# Altium PCB iMX6 Rex_V1I1_PCB.PcbDoc (part 3 of 8)
Units mm, origin at the board's own origin, x right, y up, seen from the top; angles counter-clockwise.
Board outline 70 x 40 mm, 12 copper layers (L1, L2, L3, L4, L5 (PWR), L6 (PWR), L7 (PWR), L8 (PWR), L9, L10, L11, L12), stack 1.566 mm thick; 473 components, 409 nets, 2294 pads, 1880 vias.
Unrouted connection lines stored in the file: 7.
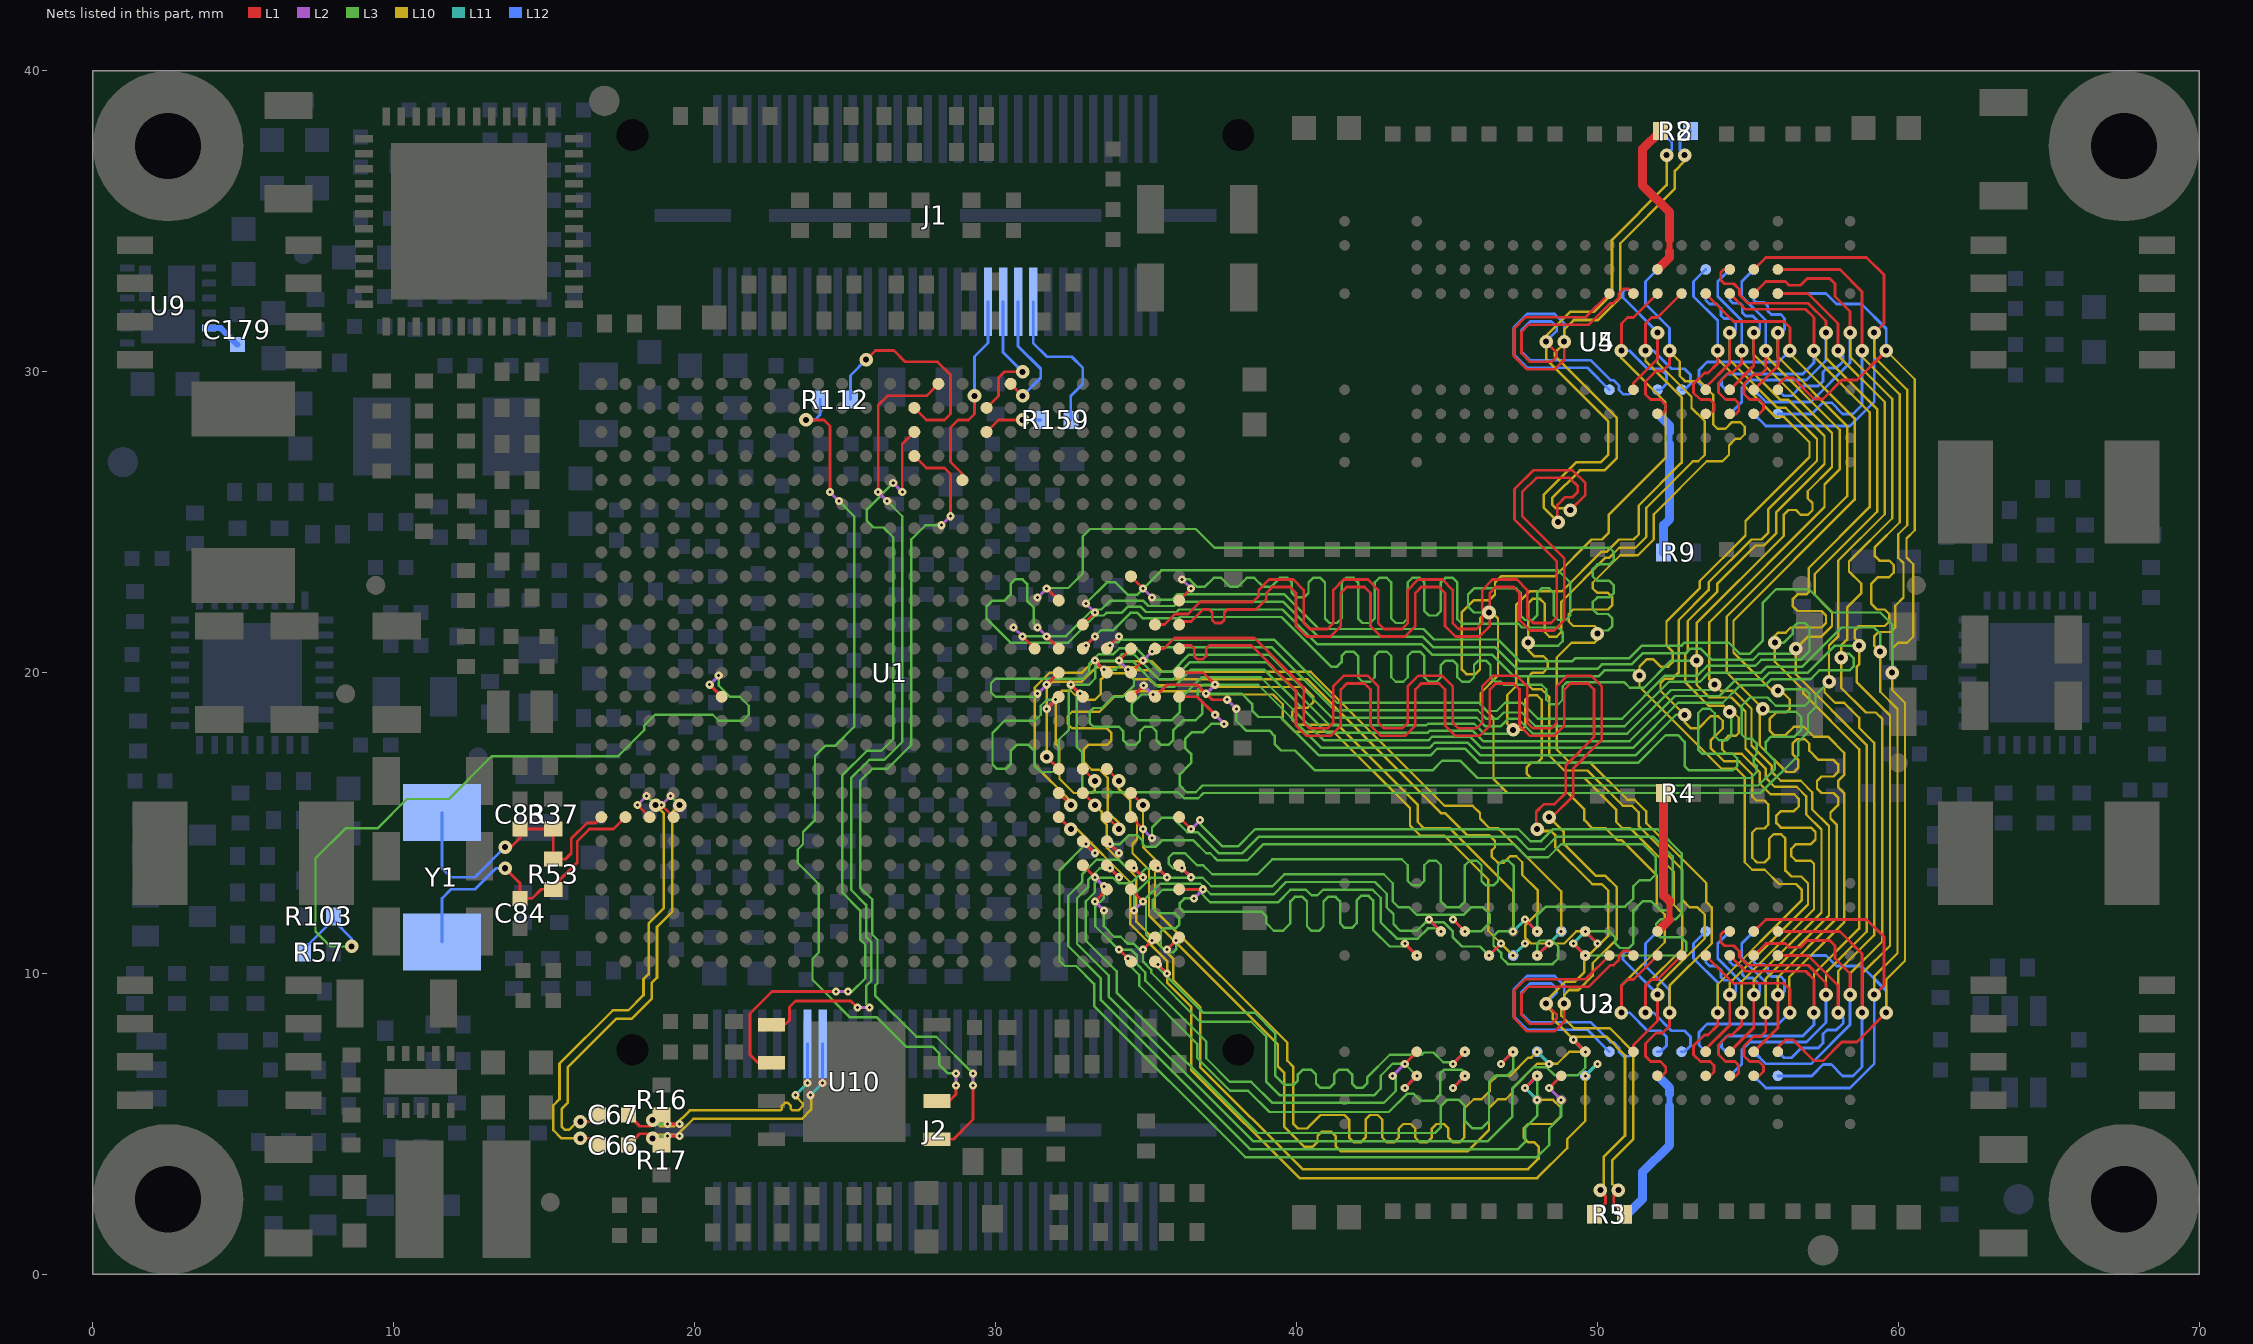
[diagram p13: the nets of this part, all layers, seen from the top]

## Via types
v1: diameter 0.45, hole 0.2, L1 to L12, tented both sides, 761 vias
v2: diameter 0.27, hole 0.1, L1 to L2, 305 vias
v3: diameter 0.27, hole 0.1, L2 to L3, 290 vias
v4: diameter 0.45, hole 0.2, L3 to L10, 196 vias
v5: diameter 0.27, hole 0.1, L11 to L12, 185 vias
v6: diameter 0.27, hole 0.1, L10 to L11, 142 vias
v7: diameter 0.45, hole 0.2, L3 to L10, tented both sides, 1 vias

## Nets (pads, with @x,y where several pads share a name; then routed paths per layer and width w, separated by ;. In a path a pad name is that pad's centre, name@x,y a point inside that pad or via, vN(x,y) a via of type N, cw(c..) or ccw(c..) an arc to the next point about the centre after c; other vN are vias at no path point) (continued)
BOOT_MODE1: R57.2 R103.1 U1.F12 | length 26.1
  L1 w0.093: v2(20.5,19.6) U1.F12@20.9,19.2
  L2 w0.1: v2(20.5,19.6) v3(20.8,19.9)
  L3 w0.08: v1(8.6,10.9) 7.9,10.9 7.4,11.4 7.4,13.83 8.395,14.825 9.455,14.825 10.43,15.8 11.831,15.8 13.256,17.225 17.461,17.225 18.325,18.089 18.325,18.238 18.687,18.6 20.6,18.6 20.8,18.4 21.6,18.4 21.8,18.6 21.8,18.9 21.5,19.2 21.17,19.2 20.8,19.57 v3(20.8,19.9)
  L12 w0.093: R57.2@7,10.7 7,10.8 R103.1@8,11.8 ; R103.1@8,11.9 R103.1@8,11.8 ; v1(8.6,10.9) 8.6,11.17 8,11.77 R103.1@8,11.8
CFF: C179.2 U9.11 | length 1.2
  L12 w0.2: U9.11@3.86,31.45 4.25,31.45 C179.2@4.8,30.9
CLK1_C_N: C66.1 U1.C7 | length 15.9
  L1 w0.09: v1(16.2,4.525) 16.575,4.525 C66.1@16.8,4.3 ; v2(18.1,15.6) U1.C7@18.5,15.2
  L2 w0.1: v2(18.1,15.6) v3(18.4,15.9)
  L3 w0.085: v3(18.4,15.9) v4(18.7,15.6)
  L10 w0.085: v1(16.2,4.525) 15.575,4.525 15.3,4.8 15.3,5.616 15.508,5.824 15.508,7.004 17.284,8.78 17.8,8.78 18.3,9.28 18.3,9.816 18.468,9.983 18.468,11.664 18.97,12.167 18.97,15.33 v4(18.7,15.6)
CLK1_C_P: C67.1 U1.D7 | length 15.8
  L1 w0.09: v1(16.2,5.075) 16.575,5.075 C67.1@16.8,5.3 ; v2(18.9,15.6) U1.D7@19.3,15.2
  L2 w0.1: v2(18.9,15.6) v3(19.2,15.9)
  L3 w0.085: v3(19.2,15.9) v4(19.5,15.6)
  L10 w0.085: v1(16.2,5.075) 16.096,5.075 15.826,4.805 15.691,4.805 15.58,4.916 15.58,5.5 15.788,5.708 15.788,6.888 17.4,8.5 17.916,8.5 18.58,9.164 18.58,9.7 18.748,9.867 18.748,11.548 19.25,12.051 19.25,15.35 ; 19.25,15.35 v4(19.5,15.6) 19.25,15.35
CLK1_N: C66.2 J2.46 R17.2 | length 11.1
  L1 w0.09: C66.2@17.8,4.3 18.175,4.675 18.525,4.675 R17.2@18.9,4.3 19.2,4.6 v2(19.5,4.6)
  L2 w0.1: v3(19.1,4.6) v2(19.5,4.6)
  L3 w0.085: v4(18.6,4.525) 18.675,4.6 v3(19.1,4.6)
  L10 w0.085: v4(18.6,4.525) 18.725,4.65 19.431,4.65 19.953,5.173 23.568,5.173 23.87,5.474 23.87,5.937 v6(23.85,5.957)
  L11 w0.1: v6(23.85,5.957) v5(24.25,6.358)
  L12 w0.09: v5(24.25,6.358) J2.46@24.25,7.67
CLK1_P: C67.2 J2.48 R16.2 | length 11.1
  L1 w0.09: C67.2@17.8,5.3 18.175,4.925 18.525,4.925 R16.2@18.9,5.3 19.2,5 v2(19.5,5)
  L2 w0.1: v3(19.1,5) v2(19.5,5)
  L3 w0.085: v4(18.6,5.125) 18.725,5 v3(19.1,5)
  L10 w0.085: v4(18.6,5.125) 18.654,5.125 18.849,4.93 19.315,4.93 19.838,5.453 22.853,5.453 22.9,5.5 22.9,5.6 23,5.7 23.1,5.7 23.2,5.6 23.2,5.5 23.247,5.453 23.453,5.453 23.59,5.59 23.59,5.69 23.35,5.931 v6(23.35,5.957)
  L11 w0.1: v6(23.35,5.957) v5(23.75,6.358)
  L12 w0.09: v5(23.75,6.358) J2.48@23.75,7.67
CPU_XTALI: C83.1 R37.1 R53.1 U1.A7 Y1.1 | length 10
  L1 w0.093: v1(13.7,14.2) 13.9,14.2 14.2,14.5 C83.1@14.2,14.8 R37.1@15.3,14.8 R53.1@15.3,13.8 15.7,13.8 15.9,14 15.9,14.483 16.417,15 16.7,15 U1.A7@16.9,15.2
  L12 w0.093: Y1.1@11.6,15.35 11.6,13.5 11.9,13.2 12.7,13.2 v1(13.7,14.2)
CPU_XTALO: C84.1 R53.2 U1.B7 Y1.2 | length 10.2
  L1 w0.093: v1(13.7,13.5) 14.2,13 14.2,12.6 C84.1@14.3,12.6 ; C84.1@14.2,12.5 14.6,12.5 14.9,12.8 R53.2@15.3,12.8 ; R53.2@15.3,12.9 16.1,13.7 16.1,14.4 16.5,14.8 17.3,14.8 U1.B7@17.7,15.2
  L12 w0.093: Y1.2@11.6,11.05 11.6,12.5 11.9,12.8 12.7,12.8 13.4,13.5 v1(13.7,13.5)
CSPI2_CLK: J1.17 R159.2 | length 5.3
  L12 w0.093: J1.17@31.25,32.33 31.25,30.955 31.705,30.5 32.53,30.5 32.9,30.13 32.9,29.6 32.5,29.2 R159.2@32.5,28.4
CSPI2_CLK_R: R159.1 U1.U23 | length 2
  L1 w0.093: U1.U23@29.7,28 30.1,28.4 v1(30.9,28.4)
  L12 w0.093: v1(30.9,28.4) R159.1@31.5,28.4
CSPI2_CS0: J1.19 U1.V25 | length 4.3
  L1 w0.093: U1.V25@30.5,29.6 v1(30.9,29.2)
  L12 w0.093: J1.19@30.75,32.33 30.75,30.85 31.5,30.1 31.5,29.8 v1(30.9,29.2)
CSPI2_MISO: J1.21 U1.U24 | length 4.6
  L1 w0.093: U1.U24@29.7,28.8 30.1,29.2 30.1,29.8 30.3,30 v1(30.9,30)
  L12 w0.093: J1.21@30.25,32.33 30.25,30.65 v1(30.9,30)
CSPI2_MOSI: J1.23 U1.T21 | length 6.8
  L1 w0.093: U1.T21@28.9,26.4 28.9,26.6 28.5,27 28.5,28.15 28.75,28.4 29.1,28.4 29.3,28.6 v1(29.3,29.2)
  L12 w0.093: v1(29.3,29.2) 29.3,30.505 29.75,30.955 J1.23@29.75,32.33
CSPI3_CLK: R112.2 U10.6 | length 29.7
  L1 w0.093: v1(23.7,28.4) 24.3,28.4 24.5,28.2 v2(24.5,26) ; U10.6@28.05,5.765 28.465,5.765 28.688,5.988 v2(28.688,6.28)
  L2 w0.1: v2(24.5,26) v3(24.8,25.7) ; v2(28.688,6.28) v3(28.688,6.68)
  L3 w0.08: v3(24.8,25.7) 25.3,25.2 25.3,18.2 24.675,17.575 24.345,17.575 24,17.23 24,15.1 23.6,14.7 23.6,14.297 23.425,14.122 23.425,13.678 24.125,12.978 24.125,10.7 23.915,10.49 23.915,9.795 25.168,8.543 26.057,8.543 27.027,7.573 27.905,7.573 28.125,7.353 28.125,6.975 28.42,6.68 v3(28.688,6.68)
  L12 w0.093: v1(23.7,28.4) 24,28.4 24.175,28.575 R112.2@24.175,29.075
CSPI3_CLK_R: R112.1 U1.P24 | length 7.6
  L1 w0.093: v1(25.7,30.4) 26.005,30.705 26.625,30.705 27,30.33 28.07,30.33 28.5,29.9 28.5,28.6 28.3,28.4 27.7,28.4 U1.P24@27.3,28.8
  L12 w0.093: R112.1@25.175,29.075 25.175,29.875 v1(25.7,30.4)
CSPI3_CS2: U1.R25 U10.1 | length 28
  L1 w0.093: U10.1@22.55,8.305 23.005,8.305 23.15,8.45 23.15,8.893 23.35,9.093 25.188,9.093 v2(25.413,8.868) ; v2(26.1,26) 26.1,28.895 26.405,29.2 27.7,29.2 U1.R25@28.1,29.6
  L2 w0.1: v2(25.413,8.868) v3(25.812,8.868) ; v2(26.1,26) v3(26.4,25.7)
  L3 w0.08: v3(25.812,8.868) 25.7,8.98 25.7,9.587 25.875,9.762 25.875,11.038 25.7,11.213 25.7,12.283 25.2,12.783 25.2,16.5 25.8,17.1 26.3,17.1 26.9,17.7 26.9,25.2 v3(26.4,25.7)
CSPI3_MISO: U1.P23 U10.2 | length 27.8
  L1 w0.093: U10.2@22.55,7.035 22.107,7.035 21.84,7.302 21.84,8.667 22.573,9.4 v2(24.7,9.4) ; v2(26.9,26) 26.9,27.6 U1.P23@27.3,28
  L2 w0.1: v2(24.7,9.4) v3(25.1,9.4) ; v3(26.6,26.3) v2(26.9,26)
  L3 w0.08: v3(25.1,9.4) 25.23,9.4 25.675,9.845 25.675,10.955 25.5,11.13 25.5,12.1 24.9,12.7 24.9,16.583 25.717,17.4 26.201,17.4 26.6,17.799 26.6,24.5 26.275,24.825 25.945,24.825 25.725,25.045 25.725,25.428 26.597,26.3 v3(26.6,26.3)
CSPI3_MOSI: U1.P22 U10.5 | length 28.2
  L1 w0.093: U1.P22@27.3,27.2 27.7,26.8 28.3,26.8 28.5,26.6 v2(28.5,25.2) ; U10.5@28.05,4.495 28.6,4.495 29.25,5.145 v2(29.25,6.28)
  L2 w0.1: v3(28.2,24.9) v2(28.5,25.2) ; v2(29.25,6.28) v3(29.25,6.68)
  L3 w0.08: v3(28.2,24.9) 27.67,24.9 27.2,24.43 27.2,17.6 26.4,16.8 25.9,16.8 25.5,16.4 25.5,12.866 25.9,12.466 25.9,11.3 26.075,11.125 26.075,9.679 25.998,9.602 25.998,9.272 27.37,7.9 28.03,7.9 v3(29.25,6.68)
DRAM0_ZQ: R4.2 U2.L8 | length 4.8
  L1 w0.2: 52.4,11.8 52.4,12.401
  L1 w0.3: U2.L8@52,11.4 52.4,11.8 ; R4.2@52.2,16 52.2,12.601 52.4,12.401
DRAM1_ZQ: R5.2 U3.L8 | length 5.4
  L12 w0.2: 52.4,5.599 52.4,6.001
  L12 w0.3: R5.2@50.9,2 51,2 51.5,2.5 51.5,3.4 52.4,4.3 52.4,5.599 ; U3.L8@52,6.6 52.4,6.2 52.4,6.001
DRAM2_ZQ: R8.2 U4.L8 | length 5.4
  L1 w0.2: 52.4,33.999 52.4,34.401
  L1 w0.3: U4.L8@52,33.4 52.4,33.8 52.4,33.999 ; R8.2@52.1,38 51.5,37.4 51.5,36.2 52.4,35.3 52.4,34.401
DRAM3_ZQ: R9.2 U5.L8 | length 4.8
  L12 w0.2: 52.4,27.599 52.4,28.001
  L12 w0.3: U5.L8@52,28.6 52.4,28.2 52.4,28.001 ; R9.2@52.2,24 52.2,24.9 52.4,25.1 52.4,27.599
DRAM_A0: U1.AC14 U2.N3 U3.N3 U4.N3 U5.N3 | length 70.8
  L1 w0.093: v2(34.1,20.4) U1.AC14@34.5,20.8 ; U2.N3@53.6,7.4 53.6,7.483 54.4,8.283 v1(54.4,9.3) ; U4.N3@53.6,29.4 53.6,29.483 54.4,30.283 v1(54.4,31.3)
  L2 w0.1: v2(34.1,20.4) v3(34.4,20.1)
  L3 w0.08: v3(34.4,20.1) 34.6,19.9 34.6,19.57 34.23,19.2 33.903,19.2 33.528,18.825 33.25,18.825 33.125,18.7 33.125,18.325 33.25,18.2 34.1,18.2 34.25,18.05 34.25,17.75 34.4,17.6 34.65,17.6 34.8,17.75 34.8,18.05 34.95,18.2 35.2,18.2 35.35,18.05 35.35,17.75 35.5,17.6 35.75,17.6 35.9,17.75 35.9,18.083 36.242,18.425 36.655,18.425 36.875,18.645 36.875,19.022 36.715,19.182 36.715,19.418 36.897,19.6 38.73,19.6 40.83,17.5 44.421,17.5 44.596,17.675 45.687,17.675 46.112,17.25 51.267,17.25 52.617,18.6 v4(52.9,18.6)
  L10 w0.08: v1(54.4,9.3) 54.4,9.691 57,12.291 57,13 56.775,13.225 56.448,13.225 56.25,13.423 56.25,14.488 56.109,14.629 55.859,14.629 55.709,14.479 55.709,13.841 55.559,13.691 55.309,13.691 55.15,13.85 55.15,14.689 55.28,14.82 55.55,14.82 55.675,14.945 55.675,15.625 55.55,15.75 55.28,15.75 55.15,15.88 55.15,16.616 54.716,17.05 54.216,17.05 53.766,17.5 53.766,17.75 54.166,18.15 54.166,18.4 54.016,18.55 53.766,18.55 53.366,18.15 53.116,18.15 52.9,18.366 v4(52.9,18.6) 52.1,19.4 52.1,19.65 52.25,19.8 52.5,19.8 52.7,20 52.7,21.742 53.7,22.742 53.7,23.004 55.121,24.425 55.455,24.425 55.675,24.645 55.675,25.418 57.3,27.043 57.3,27.762 56.262,28.8 55.993,28.8 54.4,30.393 v1(54.4,31.3)
  L12 w0.093: U3.N3@53.6,10.6 53.6,10.383 53.729,10.254 53.963,10.254 54.109,10.109 54.109,9.874 54.208,9.775 54.442,9.775 54.6,9.617 54.6,9.4 54.5,9.3 v1(54.4,9.3) ; U5.N3@53.6,32.6 53.6,32.383 53.729,32.254 53.963,32.254 54.109,32.109 54.109,31.874 54.208,31.775 54.442,31.775 54.6,31.617 54.6,31.4 54.5,31.3 v1(54.4,31.3)
DRAM_A1: U1.AB14 U2.P7 U3.P7 U4.P7 U5.P7 | length 74
  L1 w0.093: U1.AB14@33.7,20.8 v2(34.1,21.2) ; U2.P7@54.4,10.6 54.925,10.075 56.925,10.075 57.2,9.8 v1(57.2,8.7) ; U4.P7@54.4,32.6 54.925,32.075 56.925,32.075 57.2,31.8 v1(57.2,30.7)
  L2 w0.1: v3(33.8,20.9) v2(34.1,21.2)
  L3 w0.08: v3(33.8,20.9) 33.907,21.007 34.076,21.007 34.169,21.1 39.252,21.1 41.352,19 46.059,19 46.334,18.725 46.655,18.725 46.93,19 47.496,19 48.021,18.475 50.828,18.475 52.253,19.9 53.33,19.9 53.655,20.225 55.246,20.225 55.446,20.425 56.755,20.425 57.05,20.72 57.05,21.5 56.9,21.65 56.65,21.65 56.5,21.5 56.5,21.3 56.2,21 v4(55.9,21)
  L10 w0.08: v1(57.2,8.7) 57.2,9.993 58.7,11.493 58.7,17.454 56.85,19.304 56.85,19.413 55.9,20.363 v4(55.9,21) 55.9,21.225 56,21.325 56.255,21.325 56.43,21.5 57.45,21.5 57.6,21.65 57.6,21.9 57.45,22.05 56.65,22.05 56.5,22.2 56.5,22.45 56.65,22.6 56.95,22.6 57.025,22.675 57.025,23.475 59.05,25.5 59.05,28.657 57.2,30.507 v1(57.2,30.7)
  L12 w0.093: U3.P7@54.4,7.4 54.275,7.4 54.125,7.55 54.125,7.742 54.308,7.925 56.825,7.925 57.2,8.3 v1(57.2,8.7) ; U5.P7@54.4,29.4 54.275,29.4 54.125,29.55 54.125,29.742 54.308,29.925 56.825,29.925 57.2,30.3 v1(57.2,30.7)
DRAM_A2: U1.AA14 U2.P3 U3.P3 U4.P3 U5.P3 | length 68.5
  L1 w0.093: U1.AA14@32.9,20.8 v2(33.3,21.2) ; U2.P3@54.4,7.4 55.2,8.2 v1(55.2,9.3) ; U4.P3@54.4,29.4 55.2,30.2 v1(55.2,31.3)
  L2 w0.1: v3(33,20.9) v2(33.3,21.2)
  L3 w0.08: v3(33,20.9) 33.515,21.415 33.918,21.415 34.315,21.812 34.315,21.818 34.482,21.985 34.718,21.985 34.888,21.815 36.094,21.815 36.129,21.85 39.501,21.85 41.151,20.2 41.351,20.2 41.5,20.349 41.5,20.549 41.651,20.699 41.901,20.699 42.051,20.549 42.051,19.85 42.201,19.7 42.451,19.7 42.601,19.85 42.601,20.549 ; 42.6,20.55 42.749,20.699 43.001,20.699 43.151,20.549 43.151,19.85 43.301,19.7 43.551,19.7 43.701,19.85 43.701,20.551 43.849,20.699 44.101,20.699 44.251,20.549 44.251,19.85 44.401,19.7 44.651,19.7 44.801,19.85 44.801,20.249 44.949,20.399 45.201,20.399 45.351,20.249 45.351,19.85 45.501,19.7 45.751,19.7 45.901,19.85 45.901,20.25 46.051,20.4 46.301,20.4 46.451,20.25 46.451,19.851 46.601,19.701 46.782,19.701 46.883,19.6 48.15,19.6 48.3,19.45 48.3,19.099 48.449,18.95 48.7,18.95 48.85,19.1 48.85,19.55 48.975,19.675 50.9,19.675 51.075,19.5 51.55,19.5 52.45,20.4 v4(53.3,20.4)
  L10 w0.08: v1(55.2,9.3) 55.2,9.784 57.45,12.034 57.45,14.783 56.943,15.289 56.943,15.889 56.626,16.207 55.893,16.207 55.6,16.5 55.6,16.8 54.925,17.475 54.925,18.705 54.455,19.175 53.725,19.175 53.3,19.6 v4(53.3,20.4) 53.3,21.65 56.2,24.55 56.2,25.256 56.35,25.406 56.6,25.406 56.756,25.25 57,25.25 57.15,25.4 57.15,25.638 56.994,25.794 56.994,26.029 57.8,26.835 57.8,27.97 55.2,30.57 v1(55.2,31.3)
  L12 w0.093: U3.P3@54.4,10.6 54.4,10.383 54.504,10.279 54.738,10.279 54.816,10.201 54.816,9.967 54.929,9.854 55.163,9.854 55.4,9.617 55.4,9.4 55.3,9.3 v1(55.2,9.3) ; U5.P3@54.4,32.6 54.4,32.383 54.504,32.279 54.738,32.279 54.816,32.201 54.816,31.967 54.929,31.854 55.163,31.854 55.4,31.617 55.4,31.4 55.3,31.3 v1(55.2,31.3)
DRAM_A3: U1.Y14 U2.N2 U3.N2 U4.N2 U5.N2 | length 72.4
  L1 w0.093: v2(31.7,21.2) U1.Y14@32.1,20.8 ; U2.N2@53.6,6.6 53.75,6.6 53.875,6.725 53.875,6.95 53.75,7.075 53.425,7.075 53.2,7.3 53.2,7.6 53.563,7.963 53.68,7.963 54,8.283 v1(54,8.7) ; U4.N2@53.6,28.6 53.75,28.6 53.875,28.725 53.875,28.95 53.75,29.075 53.425,29.075 53.2,29.3 53.2,29.6 53.563,29.963 53.68,29.963 54,30.283 v1(54,30.7)
  L2 w0.1: v3(31.4,21.5) v2(31.7,21.2)
  L3 w0.08: v3(31.4,21.5) 31.275,21.625 31.275,22.155 31.051,22.38 31.051,22.949 30.901,23.099 30.651,23.099 30.501,22.949 30.501,22.601 30.286,22.386 29.886,22.386 29.7,22.2 29.7,21.8 30.5,21 32.414,21 33.314,21.9 33.597,21.9 33.682,21.985 34.185,21.985 34.385,22.185 34.829,22.185 34.999,22.015 36.011,22.015 36.096,22.1 39.534,22.1 40.684,20.95 44.154,20.95 44.504,20.6 46.5,20.6 47.225,19.875 50.033,19.875 50.233,20.075 51.225,20.075 v4(51.4,19.9)
  L10 w0.08: v1(54,8.7) 54,9.645 56.8,12.445 56.8,12.78 56.605,12.975 56.038,12.975 55.563,13.45 55.15,13.45 54.9,13.7 54.9,16.533 54.633,16.8 54.133,16.8 51.4,19.533 v4(51.4,19.9) 51.4,20.2 51.65,20.45 51.85,20.45 52.1,20.2 52.35,20.2 52.5,20.35 52.5,20.7 52.3,20.9 52.3,21.7 53.4,22.8 53.4,23.037 54.925,24.562 54.925,25.038 57.05,27.163 57.05,27.659 56.209,28.5 55.926,28.5 54,30.426 v1(54,30.7)
  L12 w0.093: U3.N2@53.6,11.4 53.2,11 53.2,10.5 54,9.7 v1(54,8.7) ; U5.N2@53.6,33.4 53.2,33 53.2,32.5 54,31.7 v1(54,30.7)
DRAM_A4: U1.W14 U2.P8 U3.P8 U4.P8 U5.P8 | length 75.9
  L1 w0.093: v2(30.9,21.2) U1.W14@31.3,20.8 ; U2.P8@54.4,11.4 54.2,11.4 54.1,11.3 54.1,11.05 54.225,10.925 54.535,10.925 54.725,10.735 54.725,10.558 55.008,10.275 57.008,10.275 57.6,9.683 v1(57.6,9.3) ; U4.P8@54.4,33.4 54.2,33.4 54.1,33.3 54.1,33.05 54.225,32.925 54.535,32.925 54.725,32.735 54.725,32.558 55.008,32.275 57.008,32.275 57.6,31.683 v1(57.6,31.3)
  L2 w0.1: v3(30.6,21.5) v2(30.9,21.2)
  L3 w0.08: v3(30.6,21.5) 30.885,21.215 32.346,21.215 33.231,22.1 33.514,22.1 33.799,22.385 34.912,22.385 35.082,22.215 35.928,22.215 36.063,22.35 39.566,22.35 40.716,21.2 44.187,21.2 44.537,20.85 46.6,20.85 47.325,20.125 50,20.125 50.15,20.275 51.141,20.275 51.516,20.65 52.95,20.65 53.1,20.8 53.43,20.8 53.805,20.425 55.163,20.425 55.363,20.625 56.425,20.625 v4(56.6,20.8)
  L10 w0.08: v1(57.6,9.3) 57.6,10.039 58.95,11.389 58.95,17.596 56.6,19.946 v4(56.6,20.8) 57,21.2 57.45,21.2 57.8,21.55 57.8,22.02 57.225,22.595 57.225,23.275 59.3,25.35 59.3,27.5 59.3,28.761 57.6,30.461 v1(57.6,31.3)
  L12 w0.093: U3.P8@54.4,6.6 54.8,7 54.8,7.46 55.065,7.725 56.95,7.725 57.6,8.375 v1(57.6,9.3) ; U5.P8@54.4,28.6 54.8,29 54.8,29.46 55.065,29.725 56.95,29.725 57.6,30.375 v1(57.6,31.3)
DRAM_A5: U1.AE13 U2.P2 U3.P2 U4.P2 U5.P2 | length 73.2
  L1 w0.093: U1.AE13@36.1,20 36.9,20 v2(37.3,19.6) ; U2.P2@54.4,6.6 54.6,6.6 54.7,6.7 54.7,6.95 54.575,7.075 54.265,7.075 54.025,7.315 54.025,7.625 54.363,7.963 54.48,7.963 54.8,8.283 v1(54.8,8.7) ; U4.P2@54.4,28.6 54.6,28.6 54.7,28.7 54.7,28.95 54.575,29.075 54.265,29.075 54.025,29.315 54.025,29.625 54.363,29.963 54.48,29.963 54.8,30.283 v1(54.8,30.7)
  L2 w0.1: v3(37,19.3) v2(37.3,19.6)
  L3 w0.08: v3(37,19.3) 37.003,19.303 38.183,19.303 38.525,18.961 38.525,18.745 38.745,18.525 39.473,18.525 40.748,17.25 44.454,17.25 44.679,17.475 45.604,17.475 46.079,17 51.35,17 52.275,17.925 52.675,17.925 52.9,17.7 52.9,16.9 53.05,16.75 54.5,16.75 54.65,16.9 54.65,17.15 54.5,17.3 53.5,17.3 53.35,17.45 53.35,18.65 53.5,18.8 53.75,18.8 53.9,18.65 53.9,17.9 54.05,17.75 54.3,17.75 54.45,17.9 54.45,18.65 v4(54.4,18.7)
  L10 w0.08: v1(54.8,8.7) 54.8,9.738 57.2,12.138 57.2,13.65 57.1,13.75 56.6,13.75 56.45,13.9 56.45,14.15 56.6,14.3 57.1,14.3 57.25,14.45 57.25,14.7 57.1,14.85 56.1,14.85 55.95,15 55.95,15.25 56.1,15.4 56.537,15.4 56.693,15.557 56.693,15.807 56.543,15.957 55.757,15.957 55.4,16.313 55.4,16.7 54.8,17.3 54.3,17.3 54.15,17.45 54.15,17.7 54.35,17.9 54.6,17.9 54.7,18 54.7,18.5 54.5,18.7 v4(54.4,18.7) 54.2,18.9 53.7,18.9 52.925,19.675 52.925,20.63 53,20.705 53,21.709 53.991,22.7 53.991,22.962 55.254,24.225 55.538,24.225 55.95,24.637 55.95,25.339 57.55,26.939 57.55,27.866 56.341,29.075 56.071,29.075 54.8,30.346 v1(54.8,30.7)
  L12 w0.093: U3.P2@54.4,11.4 54,11 54,10.5 54.8,9.7 v1(54.8,8.7) ; U5.P2@54.4,33.4 54,33 54,32.5 54.8,31.7 v1(54.8,30.7)
DRAM_A6: U1.AC13 U2.R8 U3.R8 U4.R8 U5.R8 | length 79.7
  L1 w0.093: U1.AC13@34.5,20 v2(34.9,20.4) ; U2.R8@55.2,11.4 55.6,11.8 58.95,11.8 59.525,11.225 59.525,9.6 59.225,9.3 v1(59.2,9.3) ; U4.R8@55.2,33.4 55.6,33.8 58.95,33.8 59.525,33.225 59.525,31.6 59.225,31.3 v1(59.2,31.3)
  L2 w0.1: v2(34.9,20.4) v3(35.2,20.7)
  L3 w0.08: v3(35.2,20.7) 35.35,20.85 39.169,20.85 41.269,18.75 46.026,18.75 46.301,18.475 46.688,18.475 46.888,18.675 47.488,18.675 47.938,18.225 50.911,18.225 52.386,19.7 53.413,19.7 53.713,20 55.434,20 55.634,20.2 56.813,20.2 58.113,21.5 59.2,21.5 59.4,21.3 v4(59.4,20.7)
  L10 w0.08: v1(59.2,9.3) 59.2,9.9 59.975,10.675 59.975,18.791 59.4,19.366 v4(59.4,20.7) 59.2,20.9 59.2,21.2 59.35,21.35 59.75,21.35 59.9,21.5 59.9,22.225 60.175,22.5 60.175,23.645 60,23.82 60,24.6 60.3,24.9 60.3,29.399 59.2,30.499 v1(59.2,31.3)
  L12 w0.093: U3.R8@55.2,6.6 55.6,6.2 58.4,6.2 59.2,7 v1(59.2,9.3) ; U5.R8@55.2,28.6 55.6,28.2 58.4,28.2 59.2,29 v1(59.2,31.3)
DRAM_A7: U1.Y13 U2.R2 U3.R2 U4.R2 U5.R2 | length 71
  L1 w0.093: v2(31.7,19.6) U1.Y13@32.1,20 ; U2.R2@55.2,6.6 55.375,6.6 55.525,6.75 55.525,6.925 55.375,7.075 55.065,7.075 54.875,7.265 54.875,7.592 55.191,7.909 55.426,7.909 55.6,8.083 v1(55.6,8.7) ; U4.R2@55.2,28.6 55.375,28.6 55.525,28.75 55.525,28.925 55.375,29.075 55.065,29.075 54.875,29.265 54.875,29.592 55.191,29.909 55.426,29.909 55.6,30.083 v1(55.6,30.7)
  L2 w0.1: v3(31.4,19.3) v2(31.7,19.6)
  L3 w0.08: v3(31.4,19.3) 31.3,19.2 30,19.2 29.85,19.35 29.85,19.65 30,19.8 32.9,19.8 33.115,20.015 33.115,20.301 33.429,20.615 33.918,20.615 34.11,20.807 34.69,20.807 35.472,20.025 35.859,20.025 36.434,20.6 39.087,20.6 41.187,18.5 45.993,18.5 46.268,18.225 46.795,18.225 47.045,18.475 47.355,18.475 47.855,17.975 50.994,17.975 52.444,19.425 53.725,19.425 v4(53.9,19.6)
  L10 w0.08: v1(55.6,8.7) 55.6,9.83 57.7,11.93 57.7,14.9 57.143,15.457 57.143,16.022 56.759,16.407 56.093,16.407 55.8,16.7 55.8,16.9 55.125,17.575 55.125,18.8 54.525,19.4 54.1,19.4 v4(53.9,19.6) 53.725,19.775 53.725,21.675 57.55,25.5 57.55,26.253 58.05,26.753 58.05,28.073 55.6,30.523 v1(55.6,30.7)
  L12 w0.093: U3.R2@55.2,11.4 54.8,11 54.8,10.5 55.6,9.7 v1(55.6,8.7) ; U5.R2@55.2,33.4 54.8,33 54.8,32.5 55.6,31.7 v1(55.6,30.7)
DRAM_A8: U1.AB13 U2.T8 U3.T8 U4.T8 U5.T8 | length 75.5
  L1 w0.093: v2(33.3,20.4) U1.AB13@33.7,20 ; U2.T8@56,11.4 58.06,11.4 58.8,10.66 v1(58.8,8.7) ; U4.T8@56,33.4 58.06,33.4 58.8,32.66 v1(58.8,30.7)
  L2 w0.1: v2(33.3,20.4) v3(33.6,20.1)
  L3 w0.08: v3(33.6,20.1) 33.997,20.1 34.282,20.385 34.546,20.385 35.406,19.525 35.925,19.525 36.5,20.1 38.921,20.1 41.021,18 44.355,18 44.43,18.075 45.852,18.075 46.202,17.725 51.076,17.725 52.576,19.225 54.055,19.225 54.605,19.775 55.492,19.775 55.717,20 57,20 57.9,20.9 v4(58.7,20.9)
  L10 w0.08: v1(58.8,8.7) 58.8,10 59.725,10.925 59.725,18.575 58.625,19.675 58.625,20.2 58.7,20.275 v4(58.7,20.9) 58.7,21 58.55,21.15 58.55,21.4 58.7,21.55 59.55,21.55 59.7,21.7 59.7,21.95 59.55,22.1 59.3,22.1 59.1,22.3 59.1,22.95 59.325,23.175 59.7,23.175 59.85,23.325 59.85,23.575 59.7,23.725 59.375,23.725 59.225,23.875 59.225,24.175 60.05,25 60.05,29.25 58.8,30.5 v1(58.8,30.7)
  L12 w0.093: U3.T8@56,6.6 57.126,6.6 57.5,6.974 57.776,6.974 58.15,6.6 58.5,6.6 58.8,6.9 v1(58.8,8.7) ; U5.T8@56,28.6 57.126,28.6 57.5,28.974 57.776,28.974 58.15,28.6 58.5,28.6 58.8,28.9 v1(58.8,30.7)
DRAM_A9: U1.AE12 U2.R3 U3.R3 U4.R3 U5.R3 | length 69.7
  L1 w0.093: U1.AE12@36.1,19.2 36.7,19.2 v2(37.3,18.6) ; U2.R3@55.2,7.4 56,8.2 v1(56,9.3) ; U4.R3@55.2,29.4 56,30.2 v1(56,31.3)
  L2 w0.1: v2(37.3,18.6) v3(37.6,18.3)
  L3 w0.08: v3(37.6,18.3) 37.175,18.3 36.9,18.025 36.525,18.025 36.3,17.8 36.3,17.5 36.5,17.3 36.5,17 36.125,16.625 36.125,16.245 36.345,16.025 36.655,16.025 36.88,16.25 55.35,16.25 55.9,16.8 55.9,17.07 55.6,17.37 55.6,17.7 55.775,17.875 56.55,17.875 56.775,18.1 56.775,18.525 56.6,18.7 55.6,18.7 v4(55.5,18.8)
  L10 w0.08: v1(56,9.3) 56,9.877 57.95,11.827 57.95,14.95 57.75,15.15 57.75,15.35 58,15.6 58,15.85 57.85,16 57.45,16 57.3,16.15 57.3,16.4 57.45,16.55 57.85,16.55 58,16.7 58,16.95 57.85,17.1 57.35,17.1 57.041,17.409 57.041,17.641 56.891,17.791 56.641,17.791 56.491,17.641 56.491,17.291 56.683,17.1 56.683,16.85 56.533,16.7 56.283,16.7 55.4,17.583 55.4,18.7 v4(55.5,18.8) 54.3,20 54.3,21.863 58.3,25.863 58.3,28.199 56,30.499 v1(56,31.3)
  L12 w0.093: U3.R3@55.2,10.6 55.2,10.383 55.283,10.3 55.55,10.3 55.663,10.188 55.663,10.02 55.783,9.9 56.1,9.9 56.225,9.775 56.225,9.4 56.125,9.3 v1(56,9.3) ; U5.R3@55.2,32.6 55.2,32.383 55.283,32.3 55.55,32.3 55.663,32.188 55.663,32.02 55.783,31.9 56.1,31.9 56.225,31.775 56.225,31.4 56.125,31.3 v1(56,31.3)
DRAM_A10: U1.AA15 U2.L7 U3.L7 U4.L7 U5.L7 | length 73.3
  L1 w0.093: U1.AA15@32.9,21.6 v2(33.3,22) ; v1(50.8,8.7) 50.8,9.6 51,9.8 51.2,9.8 U2.L7@52,10.6 ; v1(50.8,30.7) 50.8,31.6 51,31.8 51.2,31.8 U4.L7@52,32.6
  L2 w0.1: v3(33,22.3) v2(33.3,22)
  L3 w0.08: v3(33,22.3) 33.7,23 33.985,23 34.4,22.585 34.698,22.585 35.513,23.4 48.7,23.4 49.1,23 49.1,21.9 48.95,21.75 48.7,21.75 48.55,21.9 48.55,22.65 48.4,22.8 48.15,22.8 48,22.65 48,21.9 47.85,21.75 47.6,21.75 47.45,21.9 47.45,22.65 47.3,22.8 45.9,22.8 45.7,22.6 45.7,22.2 45.9,22 v4(46.4,22)
  L10 w0.08: v1(50.8,8.7) 50.8,9.6 52.24,11.04 52.24,11.964 51.97,12.235 51.97,13.275 50.82,14.425 50.679,14.425 50.279,14.825 49.845,14.825 49.57,15.1 49.57,15.455 49.025,16 47.017,16 46.55,16.467 46.55,18.5 46.125,18.925 46.125,19.325 46.7,19.9 46.7,21.8 46.5,22 v4(46.4,22) 46.3,22 46.1,21.8 46.1,20.1 45.95,19.95 45.65,19.95 45.5,20.1 45.5,22.017 45.883,22.4 46.4,22.4 46.6,22.6 46.6,23 46.8,23.2 48.583,23.2 49.808,24.425 50.155,24.425 50.375,24.645 50.375,25.242 52.267,27.134 52.267,28.987 50.8,30.454 v1(50.8,30.7)
  L12 w0.093: v1(50.8,8.7) 51.07,8.7 51.67,8.1 52.1,8.1 52.3,7.9 52.3,7.6 52.1,7.4 U3.L7@52,7.4 ; v1(50.8,30.7) 51.07,30.7 51.67,30.1 52.1,30.1 52.3,29.9 52.3,29.6 52.1,29.4 U5.L7@52,29.4
DRAM_A11: U1.AC12 U2.R7 U3.R7 U4.R7 U5.R7 | length 74.5
  L1 w0.093: U1.AC12@34.525,19.175 v2(34.925,19.575) ; U2.R7@55.2,10.6 55.6,11 56.25,11 56.375,10.875 56.75,10.875 56.975,11.1 57.725,11.1 57.9,10.925 57.9,10.5 58.4,10 v1(58.4,9.3) ; U4.R7@55.2,32.6 55.6,33 56.25,33 56.375,32.875 56.75,32.875 56.975,33.1 57.725,33.1 57.9,32.925 57.9,32.5 58.4,32 v1(58.4,31.3)
  L2 w0.1: v2(34.925,19.575) v3(35.225,19.275)
  L3 w0.08: v3(35.225,19.275) 34.845,19.275 34.525,18.955 34.525,18.645 34.745,18.425 35.855,18.425 36.125,18.695 36.125,19.125 36.85,19.85 38.813,19.85 40.913,17.75 44.388,17.75 44.513,17.875 45.77,17.875 46.145,17.5 51.184,17.5 52.684,19 54.17,19 54.745,19.575 55.575,19.575 55.775,19.775 57.075,19.775 57.375,20.075 58.375,20.075 58.525,20.225 58.525,20.475 58.375,20.625 58.225,20.625 v4(58.1,20.5)
  L10 w0.08: v1(58.4,9.3) 58.4,10 59.475,11.075 59.475,18.455 59.255,18.675 58.925,18.675 58.1,19.5 v4(58.1,20.5) 58.1,20.9 58.3,21.1 58.3,22.17 58.775,22.645 58.775,22.955 58.365,23.365 58.365,23.699 59.8,25.134 59.8,29.099 58.4,30.499 v1(58.4,31.3)
  L12 w0.093: U3.R7@55.2,7.4 55.6,7 57.1,7 58.4,8.3 v1(58.4,9.3) ; U5.R7@55.2,29.4 55.6,29 57.1,29 58.4,30.3 v1(58.4,31.3)
DRAM_A12: U1.AD12 U2.N7 U3.N7 U4.N7 U5.N7 | length 74
  L1 w0.093: U1.AD12@35.3,19.2 35.7,19.6 36.7,19.6 37.2,19.1 v2(37.7,19.1) ; U2.N7@53.6,10.6 54.525,9.675 56.2,9.675 56.4,9.475 v1(56.4,8.7) ; U4.N7@53.6,32.6 54.525,31.675 56.2,31.675 56.4,31.475 v1(56.4,30.7)
  L2 w0.1: v2(37.7,19.1) v3(38,18.8)
  L3 w0.08: v3(38,18.8) 38,18.4 38.325,18.075 39.1,18.075 39.275,17.9 39.275,17.625 39.488,17.413 39.951,17.413 40.613,16.75 44.52,16.75 44.845,17.075 45.438,17.075 46.013,16.5 55.1,16.5 55.3,16.7 55.3,16.9 55.2,17 55.2,17.2 55.3,17.3 55.3,17.65 55.15,17.8 54.95,17.8 54.8,17.95 54.8,18.9 55.075,19.175 55.655,19.175 55.93,18.9 56.9,18.9 57.05,19.05 57.05,19.3 56.9,19.45 56.05,19.45 v4(56,19.4)
  L10 w0.08: v1@56.375,8.725 56.375,9.875 58.2,11.7 58.2,16 58,16.2 58,16.4 58.2,16.6 58.2,17.338 57.663,17.875 57.191,17.875 56.866,18.2 56.53,18.2 56.255,17.925 55.875,17.925 55.725,18.075 55.725,18.455 55.945,18.675 56.275,18.675 56.4,18.8 56.4,19.1 56.1,19.4 v4(56,19.4) 55.8,19.4 54.525,20.675 54.525,21.725 58.55,25.75 58.55,28.45 56.4,30.6 v1(56.4,30.7)
  L12 w0.093: U3.N7@53.6,7.4 53.375,7.625 53.375,8.05 53.65,8.325 56.025,8.325 v1(56.4,8.7) ; U5.N7@53.6,29.4 53.375,29.625 53.375,30.05 53.65,30.325 56.025,30.325 v1(56.4,30.7)
DRAM_A13: U1.AC17 U2.T3 U3.T3 U4.T3 U5.T3 | length 73.5
  L1 w0.093: U1.AC17@34.5,23.2 v2(34.9,22.8) ; U2.T3@56,7.4 56,7.55 56.25,7.8 56.5,7.8 57.2,7.1 57.5,7.1 58.125,7.725 58.625,7.725 v1(59.6,8.7) ; U4.T3@56,29.4 56,29.55 56.25,29.8 56.4,29.8 56.5,29.8 57.2,29.1 57.5,29.1 58.125,29.725 58.625,29.725 v1(59.6,30.7)
  L2 w0.1: v2(34.9,22.8) v3(35.2,22.5)
  L3 w0.08: v3(35.2,22.5) 35.275,22.425 35.855,22.425 36.03,22.6 39.599,22.6 40.749,21.45 44.22,21.45 44.569,21.101 46.7,21.101 47.426,20.375 49.158,20.375 49.258,20.475 51.058,20.475 51.483,20.9 52.8,20.9 52.9,21 54.37,21 54.745,20.625 55.055,20.625 55.5,21.07 55.5,22.33 55.945,22.775 57.025,22.775 57.8,22 59.4,22 59.8,21.6 v4(59.8,20)
  L10 w0.08: v1(59.6,8.7) 59.6,9.8 60.225,10.425 60.225,19 59.8,19.425 v4(59.8,20) 59.8,20.8 60,21 60.3,21 60.5,21.2 60.5,23.603 60.275,23.828 60.275,24.458 60.55,24.733 60.55,29.75 v1(59.6,30.7)
  L12 w0.093: U3.T3@56,10.6 57.6,10.6 57.95,10.25 58.78,10.25 59.6,9.43 v1(59.6,8.7) ; U5.T3@56,32.6 57.6,32.6 57.95,32.25 58.78,32.25 59.6,31.43 v1(59.6,30.7)
DRAM_A14: U1.AA12 U2.T7 U3.T7 U4.T7 U5.T7 | length 69.7
  L1 w0.093: v2(32.5,19.6) U1.AA12@32.9,19.2 ; U2.T7@56,10.6 57,10.6 58,9.6 v1(58,8.7) ; U4.T7@56,32.6 57,32.6 58,31.6 v1(58,30.7)
  L2 w0.1: v2(32.5,19.6) v3(32.8,19.3)
  L3 w0.08: v3(32.8,19.3) 32.7,19.2 32.7,17.53 32.875,17.355 32.875,16.225 33.075,16.025 36.062,16.025 36.262,15.825 36.738,15.825 36.913,16 55.426,16 56.675,17.249 56.675,17.7 57,18.025 57,18.6 57.25,18.85 57.25,19.25 v4(57.7,19.7)
  L10 w0.08: v1(58,8.7) 58,10.075 59.2,11.275 59.2,17.67 58.7,18.17 58.7,18.5 58.2,19 57.9,19 57.55,19.35 57.55,19.55 v4(57.7,19.7) 57.7,20.9 58,21.2 58,23.717 59.55,25.267 59.55,28.995 58,30.545 v1(58,30.7)
  L12 w0.093: U3.T7@56,7.4 56.2,7.2 56.45,7.2 56.775,7.525 57.342,7.525 57.504,7.687 57.504,7.996 57.633,8.125 57.942,8.125 58.175,8.358 58.175,8.525 v1(58,8.7) ; U5.T7@56,29.4 56.2,29.2 56.45,29.2 56.775,29.525 57.342,29.525 57.504,29.687 57.504,29.996 57.633,30.125 57.942,30.125 58.175,30.358 58.175,30.525 v1(58,30.7)
DRAM_A15: U1.Y12 U2.M7 U3.M7 U4.M7 U5.M7 | length 71.4
  L1 w0.093: v2(31.7,18.8) U1.Y12@32.1,19.2 ; v1(51.6,8.7) 51.6,9.6 51.8,9.8 52,9.8 U2.M7@52.8,10.6 ; v1(51.6,30.7) 51.6,31.6 51.8,31.8 52,31.8 U4.M7@52.8,32.6
  L2 w0.1: v2(31.7,18.8) v3(32,19.1)
  L3 w0.08: v3(32,19.1) 31.7,19.1 31.5,18.9 31.5,18.6 31.3,18.4 30.3,18.4 29.9,18 29.9,16.95 30.05,16.8 30.35,16.8 30.5,16.95 30.5,17.4 30.7,17.6 31.1,17.6 31.3,17.4 31.3,16.9 31.5,16.7 31.9,16.7 32.1,16.9 32.1,17.77 32.43,18.1 32.43,19.4 32.63,19.6 33.1,19.6 33.315,19.815 33.315,20.218 33.497,20.4 33.986,20.4 34.193,20.607 34.607,20.607 35.439,19.775 35.892,19.775 36.467,20.35 39.004,20.35 41.104,18.25 44.323,18.25 44.373,18.3 45.91,18.3 46.235,17.975 47.075,17.975 v4(47.2,18.1)
  L10 w0.08: v1(51.6,8.7) 51.6,9.6 52.825,10.825 52.825,12 52.54,12.285 52.54,13.385 51.1,14.825 50.845,14.825 50.625,15.045 50.625,15.45 49.575,16.5 47.8,16.5 47.65,16.65 47.65,16.85 47.8,17 48,17 48.15,17.15 48.15,19.1 48,19.25 47.75,19.25 47.6,19.1 47.6,18.2 47.5,18.1 v4(47.2,18.1) 47,18.3 47,19.25 47.3,19.55 47.3,22.25 47.75,22.7 48.817,22.7 50.142,24.025 50.321,24.025 50.721,24.425 51.205,24.425 51.375,24.595 51.375,25.555 52.8,26.98 52.8,29.161 51.6,30.361 v1(51.6,30.7)
  L12 w0.093: v1(51.6,8.7) 51.87,8.7 52.47,8.1 52.9,8.1 53.1,7.9 53.1,7.6 52.9,7.4 U3.M7@52.8,7.4 ; v1(51.6,30.7) 51.87,30.7 52.47,30.1 52.9,30.1 53.1,29.9 53.1,29.6 52.9,29.4 U5.M7@52.8,29.4
DRAM_CAS_B: U1.AE16 U2.K3 U3.K3 U4.K3 U5.K3 | length 70.7
  L1 w0.093: U1.AE16@36.1,22.4 v2(36.5,22.8) ; U2.K3@51.2,7.4 51.2,7.625 52,8.425 v1(52,9.3) ; U4.K3@51.2,29.4 51.2,29.625 52,30.425 v1(52,31.3)
  L2 w0.1: v3(36.2,23.1) v2(36.5,22.8)
  L3 w0.08: v3(36.2,23.1) 36.45,23.1 36.7,22.85 36.95,22.85 37.25,23.15 37.5,23.15 37.8,22.85 38.05,22.85 38.35,23.15 38.6,23.15 38.9,22.85 39.15,22.85 39.45,23.15 39.7,23.15 39.85,23 39.85,22.651 40,22.501 40.25,22.501 40.4,22.651 40.4,23 40.55,23.15 40.8,23.15 40.95,23 40.95,21.801 41.1,21.651 41.35,21.651 41.5,21.801 41.5,23 41.65,23.15 41.9,23.15 42.05,23 42.05,21.801 42.2,21.651 42.45,21.651 42.6,21.801 42.6,23 42.75,23.15 43,23.15 43.15,23 43.15,21.801 43.3,21.651 43.55,21.651 43.7,21.801 43.7,23 43.85,23.15 44.1,23.15 44.25,23 44.25,22.051 44.4,21.901 44.65,21.901 44.8,22.051 44.8,23 44.95,23.15 45.2,23.15 45.35,23 45.35,21.775 45.5,21.625 47.375,21.625 47.5,21.5 48.7,21.5 48.85,21.35 48.85,21.05 48.7,20.9 47.8,20.9 v4(47.7,21)
  L10 w0.08: v1(52,9.3) 52,9.6 53.575,11.175 53.575,11.955 53.33,12.2 53.07,12.2 52.825,12.445 52.825,13.45 51.375,14.9 51.375,15.355 51.155,15.575 50.85,15.575 49.675,16.75 48.9,16.75 48.4,17.25 48.4,19.2 48.15,19.45 47.85,19.45 47.7,19.6 47.7,19.85 47.85,20 48.2,20 48.35,20.15 48.35,20.4 48.2,20.55 47.9,20.55 47.7,20.75 v4(47.7,21) 47.7,22.3 47.85,22.45 48.1,22.45 48.25,22.3 48.25,21.35 48.4,21.2 48.65,21.2 48.8,21.35 48.8,22.35 50.275,23.825 50.404,23.825 50.729,24.15 51.263,24.15 51.625,24.512 51.625,25.475 53.175,27.025 53.355,27.025 53.575,27.245 53.575,28.355 53.13,28.8 53.13,29.17 52,30.3 v1(52,31.3)
  L12 w0.093: U3.K3@51.2,10.6 51.075,10.725 50.925,10.725 50.85,10.65 50.85,10.463 v1@52,9.313 ; U5.K3@51.2,32.6 51.075,32.725 50.925,32.725 50.85,32.65 50.85,32.463 v1@52,31.313
DRAM_CLK0_N: R2.1 U1.AE15 U4.K7 U5.K7 | length 64.1
  L1 w0.09: U1.AE15@36.1,21.6 36.2,21.7 36.5,21.7 36.9,22.1 37.1,22.1 37.2,22 37.2,21.75 37.3,21.65 37.5,21.65 37.6,21.75 37.6,22 37.7,22.1 38.65,22.1 39,22.45 39,22.65 39.196,22.846 39.792,22.846 39.988,22.65 39.988,21.546 40.331,21.204 41.133,21.204 41.476,21.546 41.476,22.65 41.672,22.846 42.268,22.846 42.464,22.65 42.464,21.546 42.807,21.204 43.609,21.204 43.952,21.546 43.952,22.65 44.148,22.846 44.744,22.846 44.94,22.65 44.94,21.546 45.283,21.204 46.085,21.204 46.428,21.546 46.428,22.65 46.624,22.846 47.22,22.846 47.416,22.65 47.416,21.746 47.759,21.404 48.561,21.404 48.904,21.746 48.904,23.796 47.977,24.723 47.5,25.2 47.5,26 47.973,26.473 49.073,26.473 49.35,26.196 49.35,26.004 49.176,25.83 48.922,25.83 48.67,25.578 48.67,25.03 v1(48.7,25) ; v1(48.3,31) 48.3,30.992 48.65,30.642 48.65,30.504 48.476,30.33 47.77,30.33 47.48,30.62 47.48,31.327 47.718,31.565 49.718,31.565 50.434,32.28 50.54,32.28 50.72,32.46 50.72,32.6 50.87,32.75 51.05,32.75 U4.K7@51.2,32.6
  L10 w0.085: v1(48.7,25) 48.22,25.48 48.22,25.916 49.304,27 50.12,27 50.368,27.248 50.368,28.352 48.3,30.42 v1(48.3,31) 48.3,31.196 49.104,32 49.9,32 50.487,32.587 50.487,34.387 52.3,36.2 v1(52.3,37.2)
  L12 w0.09: v1(48.3,31) 48.3,31.008 48.65,31.358 48.65,31.496 48.476,31.67 ; 48.476,31.67 47.77,31.67 47.48,31.381 47.48,30.673 47.768,30.385 49.768,30.385 50.434,29.72 50.54,29.72 50.72,29.54 50.72,29.4 50.87,29.25 51.05,29.25 U5.K7@51.2,29.4 ; R2.1@52.1,38 52.471,37.629 52.471,37.379 52.3,37.208 v1(52.3,37.2)
DRAM_CLK0_P: R2.2 U1.AD15 U4.J7 U5.J7 | length 64.1
  L1 w0.09: U1.AD15@35.3,21.6 35.612,21.6 35.962,21.95 36.396,21.95 36.796,22.35 38.546,22.35 38.75,22.554 38.75,22.754 39.093,23.096 39.895,23.096 40.238,22.754 40.238,21.65 40.434,21.454 41.03,21.454 41.226,21.65 41.226,22.754 41.569,23.096 42.371,23.096 42.714,22.754 42.714,21.65 42.91,21.454 43.506,21.454 43.702,21.65 43.702,22.754 44.045,23.096 44.847,23.096 45.19,22.754 45.19,21.65 45.386,21.454 45.982,21.454 46.178,21.65 46.178,22.754 46.521,23.096 47.323,23.096 47.666,22.754 47.666,21.85 47.862,21.654 48.458,21.654 48.654,21.85 48.654,23.692 47.25,25.096 47.25,26.104 47.87,26.723 49.177,26.723 49.6,26.3 49.6,25.9 v1(49.1,25.4) ; v1(48.9,31) 48.9,30.4 48.58,30.08 47.666,30.08 47.23,30.516 47.23,31.43 47.615,31.815 49.615,31.815 U4.J7@50.4,32.6
  L10 w0.085: v1(49.1,25.4) 49.037,25.463 48.633,25.463 48.5,25.596 48.5,25.8 49.42,26.72 50.236,26.72 50.648,27.132 50.648,28.468 48.58,30.536 48.58,30.626 48.9,30.946 v1(48.9,31) 48.9,31.4 49.22,31.72 50.016,31.72 50.767,32.471 50.767,34.271 52.58,36.084 52.58,36.68 52.9,37 v1(52.9,37.2)
  L12 w0.09: v1(48.9,31) 48.9,31.6 48.58,31.92 47.666,31.92 47.23,31.484 47.23,30.57 47.665,30.135 49.664,30.135 U5.J7@50.4,29.4 ; v1(52.9,37.2) 52.746,37.354 52.746,37.646 R2.2@53.1,38
DRAM_CLK1_N: R3.1 U1.AE14 U2.K7 U3.K7 | length 64.1
  L1 w0.09: U1.AE14@36.1,20.8 36.2,20.9 36.5,20.9 36.6,20.8 36.6,20.55 36.7,20.45 36.9,20.45 37,20.55 37,20.8 37.1,20.9 38.5,20.9 39.988,19.412 39.988,18.243 40.331,17.9 41.133,17.9 41.476,18.243 41.476,19.446 41.672,19.643 42.268,19.643 42.464,19.446 42.464,18.243 42.807,17.9 43.609,17.9 43.952,18.243 43.952,19.446 44.148,19.643 44.744,19.643 44.94,19.446 44.94,18.243 45.283,17.9 46.085,17.9 46.428,18.243 46.428,19.446 46.624,19.643 47.22,19.643 47.416,19.446 47.416,18.243 47.759,17.9 48.561,17.9 48.904,18.243 48.904,19.446 49.1,19.643 49.696,19.643 49.892,19.446 49.892,17.859 48.95,16.917 48.95,16.004 48.576,15.63 48.222,15.63 47.97,15.378 47.97,14.83 v1(48,14.8) ; v1(48.3,9) 48.3,8.992 48.65,8.642 48.65,8.504 48.476,8.33 47.77,8.33 47.48,8.62 47.48,9.327 47.718,9.565 49.718,9.565 50.434,10.28 50.54,10.28 50.72,10.46 50.72,10.6 50.87,10.75 51.05,10.75 U2.K7@51.2,10.6 ; R3.1@49.9,2 50.271,2.371 50.271,2.621 50.1,2.792 v1(50.1,2.8)
  L10 w0.085: v1(48,14.8) 48.063,14.737 48.467,14.737 48.6,14.604 48.6,14.2 49.832,12.968 50.152,12.968 50.368,12.752 50.368,11.263 49.567,10.463 49.567,10.048 49.252,9.732 48.944,9.732 48.3,9.089 v1(48.3,9) 48.3,8.92 48.52,8.7 48.52,8.484 49.102,7.902 50.298,7.902 50.92,7.28 50.92,4.616 50.22,3.916 50.22,2.92 v1(50.1,2.8)
  L12 w0.09: v1(48.3,9) 48.3,9.008 48.65,9.358 48.65,9.496 ; 48.646,9.501 48.476,9.67 47.77,9.67 47.48,9.381 47.48,8.673 47.768,8.386 49.768,8.386 50.434,7.72 50.54,7.72 50.72,7.54 50.72,7.4 50.87,7.25 51.05,7.25 U3.K7@51.2,7.4
DRAM_CLK1_P: R3.2 U1.AD14 U2.J7 U3.J7 | length 64
  L1 w0.09: U1.AD14@35.3,20.8 35.6,20.8 35.95,21.15 38.604,21.15 40.238,19.516 40.238,18.346 40.434,18.15 41.03,18.15 41.226,18.346 41.226,19.55 41.569,19.893 42.371,19.893 42.714,19.55 42.714,18.346 42.91,18.15 43.506,18.15 43.702,18.346 43.702,19.55 44.045,19.893 44.847,19.893 45.19,19.55 45.19,18.346 45.386,18.15 45.982,18.15 46.178,18.346 46.178,19.55 46.521,19.893 47.323,19.893 47.666,19.55 47.666,18.346 47.862,18.15 48.458,18.15 48.654,18.346 48.654,19.55 48.997,19.893 49.799,19.893 50.142,19.55 50.142,17.755 49.2,16.813 49.2,15.9 48.5,15.2 v1(48.4,15.2) ; v1(48.9,9) 48.9,8.4 48.58,8.08 47.666,8.08 47.23,8.516 47.23,9.43 47.615,9.815 49.615,9.815 U2.J7@50.4,10.6 ; v1(50.7,2.8) 50.546,2.646 50.546,2.354 R3.2@50.9,2
  L10 w0.085: v1(48.4,15.2) 48.88,14.72 48.88,14.316 49.948,13.248 50.268,13.248 50.648,12.868 50.648,11.148 49.847,10.347 49.847,9.932 49.368,9.452 49.06,9.452 48.9,9.293 v1(48.9,9) 48.8,8.9 48.8,8.6 49.218,8.182 50.414,8.182 51.2,7.396 51.2,4.5 50.5,3.8 50.5,3 v1(50.7,2.8)
  L12 w0.09: v1(48.9,9) 48.9,9.6 48.58,9.92 47.666,9.92 47.23,9.484 47.23,8.57 47.665,8.136 49.664,8.136 U3.J7@50.4,7.4
DRAM_CS0_B: U1.Y16 U2.L2 U3.L2 U4.L2 U5.L2 | length 73.8
  L1 w0.093: v2(31.7,22.8) U1.Y16@32.1,22.4 ; U2.L2@52,6.6 52.15,6.6 52.275,6.725 52.275,6.9 52.1,7.075 51.775,7.075 51.6,7.25 51.6,7.675 51.946,8.021 52.171,8.021 52.4,8.25 v1(52.4,8.7) ; U4.L2@52,28.6 52.15,28.6 52.275,28.725 52.275,28.9 52.1,29.075 51.775,29.075 51.6,29.25 51.6,29.675 51.946,30.021 52.171,30.021 52.4,30.25 v1(52.4,30.7)
  L2 w0.1: v3(31.4,22.5) v2(31.7,22.8)
  L3 w0.08: v3(31.4,22.5) 31.715,22.815 32.415,22.815 32.9,23.3 32.9,24.53 33.145,24.775 36.655,24.775 37.28,24.15 50.4,24.15 50.55,24 50.55,23.75 50.4,23.6 50,23.6 49.85,23.45 49.85,23.2 50,23.05 50.4,23.05 50.55,22.9 50.55,22.65 50.4,22.5 50,22.5 49.85,22.35 49.85,22.1 50,21.95 50.35,21.95 50.5,21.8 50.5,21.55 50.35,21.4 50.1,21.4 v4(50,21.3)
  L10 w0.08: v1(52.4,8.7) 52.4,9.6 53.8,11 53.8,12.2 53.625,12.375 53.625,13 51.625,15 51.625,15.388 51.238,15.775 51,15.775 49.775,17 49.1,17 48.65,17.45 48.65,20.5 49.15,21 49.9,21 50,21.1 v4(50,21.3) 50,21.45 49.9,21.55 49.2,21.55 49.05,21.7 49.05,21.95 49.2,22.1 50.35,22.1 50.5,22.25 50.5,22.5 50.35,22.65 50,22.65 49.85,22.8 49.85,22.988 50.762,23.9 51.346,23.9 51.875,24.429 51.875,25.262 53.638,27.025 54.155,27.025 54.375,27.245 54.375,27.555 54.595,27.775 54.75,27.775 54.9,27.925 54.9,28.175 54.75,28.325 54.475,28.325 54.25,28.1 54,28.1 53.85,28.25 53.85,29.233 53.391,29.691 52.909,29.691 52.741,29.859 52.741,30.341 52.4,30.683 v1(52.4,30.7)
  L12 w0.093: U3.L2@52,11.4 51.6,11 51.6,10.25 52.4,9.45 v1(52.4,8.7) ; U5.L2@52,33.4 51.6,33 51.6,32.25 52.4,31.45 v1(52.4,30.7)
DRAM_D0: U1.AD2 U2.D7 | length 17.3
  L1 w0.093: v2(34.9,10.8) U1.AD2@35.3,11.2 ; v3(46.4,10.6) v2(46.8,11)
  L2 w0.1: v2(34.9,10.8) v3(35.2,11.1) ; v3(46.4,10.6) v2(46.8,11)
  L3 w0.08: v3(35.2,11.1) 35,11.3 35,12.513 35.472,12.985 36.801,12.985 37.153,12.633 39.248,12.633 39.657,13.042 42.608,13.042 43,12.65 43,12.2 43.225,11.975 43.225,11.645 43.445,11.425 44.012,11.425 44.287,11.7 44.903,11.7 45.2,11.403 45.2,11.2 45.5,10.9 46.1,10.9 v3(46.4,10.6)
DRAM_D1: U1.AE2 U2.B8 | length 17.3
  L1 w0.093: v2(35.7,10.8) U1.AE2@36.1,11.2 ; v2(44.4,11.8) v3(44.8,11.4)
  L2 w0.1: v2(35.7,10.8) v3(36,11.1) ; v2(44.4,11.8) v3(44.8,11.4)
  L3 w0.08: v3(36,11.1) 36,10.8 35.9,10.7 35.7,10.7 35.485,10.915 35.485,11.385 35.6,11.5 35.985,11.5 36.1,11.615 36.1,11.867 35.967,12 35.4,12 35.225,12.175 35.225,12.455 35.555,12.785 36.718,12.785 37.136,12.367 39.382,12.367 39.8,12.785 40.315,12.785 40.5,12.6 40.7,12.6 40.885,12.785 42.532,12.785 42.8,12.517 42.8,11.7 43.338,11.162 44.032,11.162 44.37,11.5 44.7,11.5 v3(44.8,11.4)
DRAM_D2: U1.AC4 U2.C8 | length 17.3
  L1 w0.093: U1.AC4@34.5,12.8 v2(34.9,12.4) ; v2(45.2,11.8) v3(45.6,11.4)
  L2 w0.1: v3(34.6,12.1) v2(34.9,12.4) ; v2(45.2,11.8) v3(45.6,11.4)
  L3 w0.08: v3(34.6,12.1) 34.6,12.623 35.162,13.185 36.884,13.185 37.169,12.9 39.2,12.9 39.6,13.3 42.9,13.3 43.2,13 43.2,12.4 43.4,12.2 43.75,12.2 44,11.95 45.55,11.95 45.8,12.2 46.2,12.2 46.425,11.975 46.425,11.695 46.13,11.4 v3(45.6,11.4)
DRAM_D3: U1.AA5 U2.A3 | length 17.3
  L1 w0.093: U1.AA5@32.9,13.6 v2(33.3,13.2) ; v2(43.6,7) U2.A3@44,7.4
  L2 w0.1: v2(33.3,13.2) v3(33.6,12.9) ; v3(43.2,6.6) v2(43.6,7)
  L3 w0.08: v3(33.6,12.9) 33.6,12.503 33.315,12.218 33.315,11.572 34.102,10.785 34.518,10.785 34.7,10.603 34.7,10.313 34.975,10.038 34.975,9.768 37,7.743 37,7.183 37.783,6.4 38.5,6.4 39.2,5.7 42.9,5.7 43.3,6.1 43.3,6.5 v3(43.2,6.6)
DRAM_D4: U1.AC1 U2.C2 | length 17.3
  L1 w0.093: v2(34.1,10.8) U1.AC1@34.5,10.4 ; v2(45.2,6.2) v3(45.6,6.6)
  L2 w0.1: v2(34.1,10.8) v3(34.4,10.5) ; v2(45.2,6.2) v3(45.6,6.6)
  L3 w0.08: v3(34.4,10.5) 34.4,10.33 34.775,9.955 34.775,9.593 36.7,7.668 36.7,7.2 37.8,6.1 38.4,6.1 39.1,5.4 43.07,5.4 43.67,6 43.9,6 44.125,5.775 44.575,5.775 44.775,5.975 44.775,6.675 44.9,6.8 45.5,6.8 45.6,6.7 v3(45.6,6.6)
DRAM_D5: U1.AD1 U2.C3 | length 17.3
  L1 w0.093: U1.AD1@35.3,10.4 v2(35.7,10) ; v2(45.2,7) v3(45.6,7.4)
  L2 w0.1: v3(35.4,10.3) v2(35.7,10) ; v2(45.2,7) v3(45.6,7.4)
  L3 w0.08: v3(35.4,10.3) 35.4,10.2 36.9,8.7 38.613,8.7 39.3,8.013 39.3,6.6 39.6,6.3 39.9,6.3 40.05,6.45 40.05,6.65 40.2,6.8 40.5,6.8 40.65,6.65 40.65,6.35 40.8,6.2 41.1,6.2 41.25,6.35 41.25,6.65 41.4,6.8 41.7,6.8 41.85,6.65 41.85,6.35 42,6.2 42.2,6.2 42.35,6.35 42.35,6.55 43.1,7.3 44.17,7.3 44.245,7.375 44.555,7.375 44.88,7.05 45.25,7.05 v3(45.6,7.4)
DRAM_D6: U1.AB4 U2.A2 | length 17.3
  L1 w0.093: v2(33.3,12.4) U1.AB4@33.7,12.8 ; v2(43.6,6.2) v3(44,6.6)
  L2 w0.1: v2(33.3,12.4) v3(33.6,12.1) ; v2(43.6,6.2) v3(44,6.6)
  L3 w0.08: v3(33.6,12.1) 33.6,11.57 33.945,11.225 34.163,11.225 34.403,10.985 34.601,10.985 34.9,10.686 34.9,10.396 35.175,10.121 35.175,10.025 36.8,8.4 38.5,8.4 39,7.9 39,6.4 39.45,5.95 42.575,5.95 42.8,6.175 42.8,6.603 43.197,7 43.6,7 v3(44,6.6)
DRAM_D7: U1.AE4 U2.A7 | length 17.3
  L1 w0.093: U1.AE4@36.1,12.8 v2(36.9,12.8) ; v2(43.6,11) v3(44,10.6)
  L2 w0.1: v3(36.6,12.5) v2(36.9,12.8) ; v2(43.6,11) v3(44,10.6)
  L3 w0.08: v3(36.6,12.5) 36.275,12.5 36.125,12.35 36.125,12.175 36.25,12.05 38.85,12.05 39,11.9 39,11.67 39.245,11.425 39.555,11.425 39.8,11.67 39.8,12.4 39.95,12.55 40.2,12.55 40.35,12.4 40.35,11.57 40.5,11.42 40.75,11.42 40.9,11.57 40.9,12.4 41.05,12.55 41.3,12.55 41.45,12.4 41.45,11.67 41.6,11.52 41.85,11.52 42,11.67 42,12.43 42.15,12.58 42.4,12.58 42.55,12.43 42.55,11.45 43.1,10.9 43.7,10.9 v3(44,10.6)
DRAM_D8: U1.AD5 U2.E3 | length 27.6
  L1 w0.093: U1.AD5@35.3,13.6 v2(35.7,13.2) ; v2(46.8,7) v3(47.2,7.4)
  L2 w0.1: v3(35.4,13.5) v2(35.7,13.2) ; v2(46.8,7) v3(47.2,7.4)
  L3 w0.08: v3(35.4,13.5) 35.003,13.5 34.503,13 34.085,13 33.9,13.185 33.482,13.185 33.3,13.003 33.3,12.7 33,12.4 33,11.1 34.025,10.075 34.025,9.375 38.7,4.7 44.6,4.7 44.8,4.9 44.8,5.6 45,5.8 45.4,5.8 45.6,5.6 45.6,5.1 45.837,4.863 46.163,4.863 46.4,5.1 46.4,6.4 46.6,6.6 47,6.6 47.2,6.8 v3(47.2,7.4)
DRAM_D9: U1.AE5 U2.F7 | length 27.6
  L1 w0.093: U1.AE5@36.1,13.6 v2(36.5,13.2) ; v3(48,10.6) v2(48.4,11)
  L2 w0.1: v3(36.2,13.5) v2(36.5,13.2) ; v3(48,10.6) v2(48.4,11)
  L3 w0.08: v3(36.2,13.5) 35.9,13.5 35.75,13.65 35.75,13.85 35.9,14 36.3,14 36.7,13.6 36.9,13.6 37.2,13.3 38.7,13.3 39.2,13.8 43.5,13.8 43.7,13.6 43.7,13.08 43.85,12.93 44.1,12.93 44.25,13.08 44.25,13.6 44.4,13.75 44.65,13.75 44.8,13.6 44.8,12.4 45,12.2 45.4,12.2 45.6,12.4 45.6,13.6 45.75,13.75 46,13.75 46.15,13.6 46.15,13.08 46.3,12.93 46.55,12.93 46.7,13.08 46.7,13.6 46.85,13.75 47.05,13.75 47.225,13.575 47.225,11.525 47.1,11.4 46.7,11.4 46.55,11.25 46.55,10.938 46.8,10.688 46.8,10.544 47.029,10.315 48.515,10.315 48.7,10.5 48.7,10.9 48.5,11.1 48.1,11.1 48,11 v3(48,10.6)
DRAM_D10: U1.AA6 U2.G2 | length 27.6
  L1 w0.093: U1.AA6@32.9,14.4 v2(33.3,14) ; v2(48.4,6.2) U2.G2@48.8,6.6
  L2 w0.1: v3(33,14.3) v2(33.3,14) ; v2(48.4,6.2) v3(48.8,5.8)
  L3 w0.08: v3(33,14.3) 32.125,13.425 32.125,10.425 32.3,10.25 32.68,10.25 33.275,9.655 33.275,8.925 38.3,3.9 48,3.9 48.4,4.3 48.4,4.85 48.8,5.25 v3(48.8,5.8)
DRAM_D11: U1.AE7 U2.H7 | length 27.6
  L1 w0.093: U1.AE7@36.1,15.2 v2(36.5,14.8) ; v2(49.2,11) v3(49.6,10.6)
  L2 w0.1: v2(36.5,14.8) v3(36.8,15.1) ; v2(49.2,11) v3(49.6,10.6)
  L3 w0.08: v3(36.8,15.1) 36.8,14.97 37.545,14.225 38.055,14.225 38.63,14.8 47.37,14.8 47.77,14.4 48.13,14.4 48.53,14.8 52,14.8 52.8,14 52.8,12 52.6,11.8 52.1,11.8 51.95,11.65 51.95,11.35 52.1,11.2 52.8,11.2 52.95,11.05 52.95,10.75 52.8,10.6 v3(49.6,10.6)
DRAM_D12: U1.AB5 U2.H3 | length 27.6
  L1 w0.093: U1.AB5@33.7,13.6 v2(34.1,13.2) ; v2(49.2,7.8) v3(49.6,7.4)
  L2 w0.1: v3(33.8,13.5) v2(34.1,13.2) ; v2(49.2,7.8) v3(49.6,7.4)
  L3 w0.08: v3(33.8,13.5) 33.464,13.5 33.075,13.111 33.075,12.868 32.708,12.501 32.708,10.992 33.758,9.942 33.758,9.234 38.559,4.433 46.364,4.433 47.175,5.245 47.175,6.178 47.882,6.885 48.315,6.885 48.575,6.625 49.355,6.625 49.6,6.87 v3(49.6,7.4)
DRAM_D13: U1.AC5 U2.F2 | length 27.6
  L1 w0.093: U1.AC5@34.5,13.6 v2(34.9,13.2) ; v2(47.6,6.2) v3(48,6.6)
  L2 w0.1: v3(34.6,13.5) v2(34.9,13.2) ; v2(47.6,6.2) v3(48,6.6)
  L3 w0.08: v3(34.6,13.5) 34.368,13.5 34.083,13.785 33.365,13.785 32.875,13.295 32.875,13.045 32.417,12.586 32.417,10.918 33.5,9.834 33.5,9.118 38.451,4.167 47.367,4.167 47.6,4.4 47.6,4.87 48,5.27 v3(48,6.6)
DRAM_D14: U1.AB6 U2.F8 | length 27.6
  L1 w0.093: U1.AB6@33.7,14.4 v2(34.1,14) ; v2(47.6,11.8) v3(48,11.4)
  L2 w0.1: v3(33.8,14.3) v2(34.1,14) ; v2(47.6,11.8) v3(48,11.4)
  L3 w0.08: v3(33.8,14.3) 34.13,14.3 34.43,14.6 34.703,14.6 34.885,14.418 34.885,14.315 34.985,14.215 35.318,14.215 35.528,14.425 36.575,14.425 37,14 37.134,14 37.372,13.762 38.362,13.762 38.9,14.3 47.23,14.3 47.664,13.867 48.367,13.867 48.8,14.3 51.511,14.3 51.945,13.866 51.945,13.3 51.745,13.1 51.4,13.1 51.2,12.9 51.2,12.5 50.925,12.225 48.295,12.225 48,11.93 v3(48,11.4)
DRAM_D15: U1.AC7 U2.H8 | length 27.6
  L1 w0.093: U1.AC7@34.5,15.2 v2(34.9,14.8) ; v3(49.6,11.4) v2(50,11)
  L2 w0.1: v2(34.9,14.8) v3(35.2,14.5) ; v3(49.6,11.4) v2(50,11)
  L3 w0.08: v3(35.2,14.5) 35.2,14.85 35.525,15.175 35.893,15.175 36.368,14.7 36.717,14.7 37.423,13.994 38.194,13.994 38.75,14.55 47.3,14.55 47.717,14.133 48.233,14.133 48.65,14.55 51.85,14.55 52.5,13.9 52.5,12.3 52.3,12.1 52.1,12.1 51.8,12.4 51.5,12.4 51.198,12.098 51.198,10.998 51.05,10.85 50.75,10.85 50.6,11 50.6,11.2 50.4,11.4 v3(49.6,11.4)
DRAM_D16: U1.AB7 U3.E3 | length 28.5
  L1 w0.093: U1.AB7@33.7,15.2 v1(34.1,14.8)
  L10 w0.08: v1(34.1,14.8) 34.1,15 33.725,15.375 33.725,16.505 33.455,16.775 33.195,16.775 32.925,17.045 32.925,17.45 33.075,17.6 33.7,17.6 33.85,17.75 33.85,18 33.7,18.15 32.55,18.15 32.4,18.3 32.4,18.55 32.55,18.7 33.45,18.7 33.975,19.225 34.255,19.225 34.415,19.385 37.04,19.385 37.15,19.275 39.219,19.275 39.543,18.95 39.543,18.432 39.937,18.038 41.236,18.038 43.775,15.499 43.775,14.925 44.113,14.587 44.913,14.587 46.375,13.125 46.375,11.425 v6(47.2,10.6)
  L11 w0.1: v6(47.2,10.6) v5(47.6,11)
  L12 w0.093: v6(47.2,10.6) v5(47.6,11)
DRAM_D17: U1.AA8 U3.F8 | length 28.5
  L1 w0.093: U1.AA8@32.9,16 v1(33.3,15.6)
  L10 w0.08: v1(33.3,15.6) 33.525,15.375 33.525,15.117 33.7,14.942 33.7,14.183 34.675,13.208 34.675,11.725 35.9,10.5 35.9,9.783 36.8,8.883 36.8,6.9 40.2,3.5 47.7,3.5 48.05,3.85 48.05,4.25 47.9,4.4 47.7,4.4 47.55,4.55 47.55,4.85 47.7,5 48.53,5 48.775,5.245 48.775,5.555 48.53,5.8 v6(48,5.8)
  L11 w0.1: v5(47.6,6.2) v6(48,5.8)
  L12 w0.093: v5(47.6,6.2) U3.F8@48,6.6
DRAM_D18: U1.AB9 U3.H7 | length 28.5
  L1 w0.093: U1.AB9@33.7,16.8 v1(34.1,16.4)
  L10 w0.08: v1(34.1,16.4) 34.1,16.13 34.475,15.755 34.475,15.4 34.7,15.175 34.7,14.45 34.55,14.3 34.55,14 35.1,13.45 35.1,11.93 39.387,7.643 39.387,6.913 39.6,6.7 39.6,4.9 40.25,4.25 40.55,4.25 40.7,4.4 40.7,4.6 40.85,4.75 41.15,4.75 41.3,4.6 41.3,4.267 41.467,4.1 45.7,4.1 46.4,4.8 46.4,5.53 46.695,5.825 46.955,5.825 47.175,6.045 47.175,6.178 47.997,7 48.67,7 49.07,7.4 v6(49.6,7.4)
  L11 w0.1: v5(49.2,7.8) v6(49.6,7.4)
  L12 w0.093: v5(49.2,7.8) v6(49.6,7.4)
DRAM_D19: U1.Y9 U3.H3 | length 28.5
  L1 w0.093: v1(31.7,17.2) U1.Y9@32.1,16.8
  L10 w0.08: v1(31.7,17.2) 31.7,19.5 31.9,19.7 32.859,19.7 33.334,20.175 34.625,20.175 34.717,20.083 35.125,20.083 35.424,19.785 40.346,19.785 44.8,15.33 44.939,15.33 45.67,14.6 46.4,14.6 46.6,14.4 46.6,14.199 46.488,14.087 46.488,13.885 46.688,13.685 46.89,13.685 47.101,13.897 47.303,13.897 47.503,13.697 47.503,13.28 48.025,12.758 48.025,12.025 47.6,11.6 47.6,11.2 47.8,11 48.9,11 49.3,11.4 v6(49.6,11.4)
  L11 w0.1: v5(49.2,11) v6(49.6,11.4)
  L12 w0.093: v5(49.2,11) U3.H3@49.6,10.6
DRAM_D20: U1.Y7 U3.H8 | length 28.5
  L1 w0.093: U1.Y7@32.1,15.2 v1(32.5,14.8)
  L10 w0.08: v1(32.5,14.8) 32.709,14.8 34.475,13.034 34.475,11.642 35.7,10.417 35.7,9.7 36.5,8.9 36.5,6.8 40.1,3.2 48,3.2 49,4.2 49,4.5 49.6,5.1 v6(49.6,6.6)
  L11 w0.1: v6(49.6,6.6) v5(50,7)
  L12 w0.093: v6(49.6,6.6) v5(50,7)
DRAM_D21: U1.Y8 U3.G2 | length 28.6
  L1 w0.093: U1.Y8@32.1,16 v1(32.5,15.6)
  L10 w0.08: v1(32.5,15.6) 32.5,15.73 31.3,16.93 31.3,19.5 31.8,20 32.876,20 33.251,20.375 35.195,20.375 35.545,20.025 40.475,20.025 44.925,15.575 45.855,15.575 46.1,15.33 46.1,15.15 46.425,14.825 46.705,14.825 48.8,12.73 v6(48.8,11.4)
  L11 w0.1: v5(48.4,11) v6(48.8,11.4)
  L12 w0.093: v5(48.4,11) v6(48.8,11.4)
DRAM_D22: U1.AC8 U3.F7 | length 28.5
  L1 w0.093: U1.AC8@34.5,16 v1(34.9,15.6)
  L10 w0.08: v1(34.9,15.6) 34.9,14.2 35.3,13.8 35.3,12.1 39.7,7.7 39.7,7.1 39.9,6.9 39.9,5 40.05,4.85 40.35,4.85 40.8,5.3 41.6,5.3 41.75,5.15 41.75,4.55 41.9,4.4 42.15,4.4 42.3,4.55 42.3,5.15 42.45,5.3 42.7,5.3 42.85,5.15 42.85,4.55 43,4.4 43.25,4.4 43.4,4.55 43.4,4.85 43.55,5 43.8,5 43.95,4.85 43.95,4.55 44.1,4.4 44.35,4.4 44.5,4.55 44.5,4.85 44.65,5 44.9,5 45.05,4.85 45.05,4.55 45.2,4.4 45.425,4.4 45.575,4.55 45.575,5.505 45.895,5.825 46.155,5.825 46.425,6.095 46.425,6.355 46.67,6.6 47.1,6.6 47.7,7.2 47.8,7.2 v6(48,7.4)
  L11 w0.1: v6(48,7.4) v5(48.4,7)
  L12 w0.093: v6(48,7.4) v5(48.4,7)
DRAM_D23: U1.AA9 U3.F2 | length 28.6
  L1 w0.093: U1.AA9@32.9,16.8 v1(33.3,16.4)
  L10 w0.08: v1(33.3,16.4) 33.3,16.1 33.2,16 32.6,16 32.125,16.475 32.125,17.5 32,17.625 32,19.2 32.2,19.4 32.5,19.4 32.8,19.1 33.3,19.1 33.5,19.3 33.5,19.775 33.7,19.975 34.4,19.975 34.6,19.775 35.117,19.775 35.307,19.585 37.123,19.585 37.183,19.525 40.236,19.525 40.553,19.208 40.553,19.013 40.378,18.838 40.005,18.838 39.855,18.688 39.855,18.438 40.03,18.263 41.38,18.263 44.025,15.619 44.025,15.045 44.245,14.825 45.105,14.825 47.2,12.73 v6(47.2,11.4)
  L11 w0.1: v6(47.2,11.4) v5(47.6,11.8)
  L12 w0.093: v5(47.6,11.8) U3.F2@48,11.4